# Altium PCB Audio-Switcher-v1.1.PcbDoc (part 1 of 2)
Units mil, origin at the board's own origin, x right, y up, seen from the top; angles counter-clockwise.
Board outline 6000 x 4000 mil, 2 copper layers (Top Layer, Bottom Layer); 150 components, 118 nets, 462 pads, 0 vias.
Unrouted connection lines stored in the file: 298.
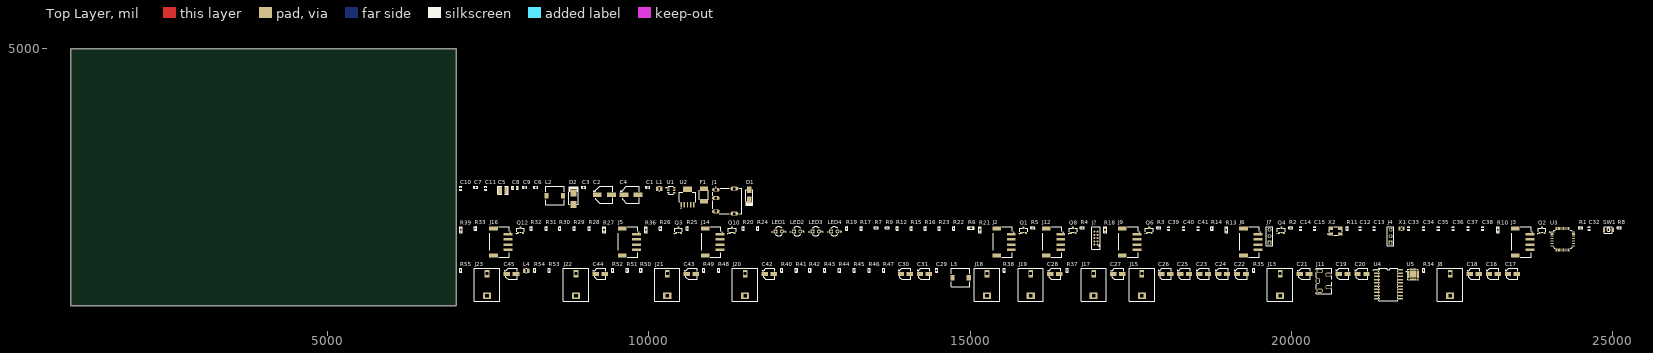
[diagram p0: Top Layer view]
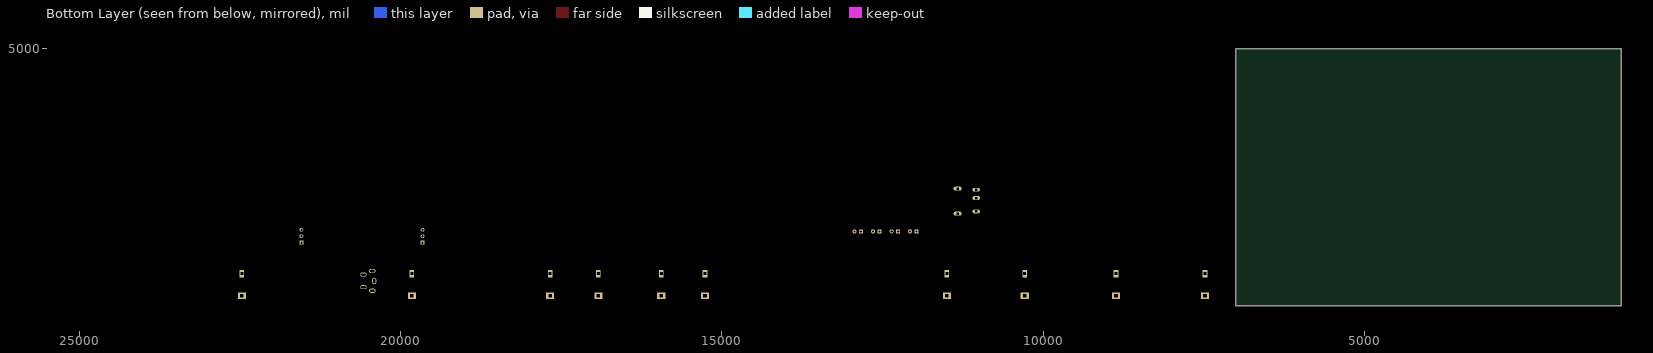
[diagram p1: Bottom Layer view, seen from below]

## Layer stack, top to bottom
Top Solder: solder mask 0.4, Solder Resist, Dk 3.5
Top Layer: signal copper 1.4
Dielectric 1: dielectric 12.6, FR-4, Dk 4.8
Bottom Layer: signal copper 1.4
Bottom Solder: solder mask 0.4, Solder Resist, Dk 3.5

## Board outline
1000,1000 7000,1000 7000,5000 1000,5000

## Design rules (kind name [scope] priority, off if disabled: settings)
Clearance [All] p1: gap=10 ignorepadtopadclearanceinfootprint=FALSE except(0: Arc-Hole Track-Hole SMDPad-Hole THPad-Hole Via-Hole Fill-Hole Poly-Hole Region-Hole Text-Hole)
PolygonConnect [All] p1: connectstyle=Relief reliefconductorwidth=10 reliefentries=4 polygonreliefangle="90 Angle" airgapwidth=10
RoutingVias [All] p1: holewidth=28 width=50 viastyle="Through Hole" minholewidth=28 minwidth=50 maxholewidth=28 maxwidth=50
SolderMaskExpansion [All] p1: expansion=4 istentingtop=FALSE
Width [All] p1: maxlimit=10 minlimit=10 preferedwidth=10
30 further rules are at their usual default settings.

## Classes and differential pairs
component class U_Power-Sheet: C1 C2 C3 C4 C5 C6 C7 C8 C9 C10 C11 D1 D2 F1 J1 L1 L2 U1 U2
component class U_Controller-Sheet: C12 C13 C14 C15 C32 C33 C34 C35 C36 C37 C38 C39 C40 C41 J2 J3 J4 J5 J6 J7 J9 J12 J14 J16 J? LED1 LED2 LED3 LED4 Q1 Q2 Q3 Q4 Q6 Q8 Q10 Q12 R1 R2 R3 R4 R5 R6 R7 R8 R9 R10 R11 R12 R13 R14 R15 R16 R17 R18 R19 R20 R21 R22 R23 R24 R25 R26 R27 R28 R29 R30 R31 R32 R33 R36 R39 SW1 U3 X1 X2
component class U_Audio-Interface-Sheet: C16 C17 C18 C19 C20 C21 C22 C23 C24 C25 C26 C27 C28 C29 C30 C31 C42 C43 C44 C45 J8 J11 J13 J15 J17 J18 J19 J20 J21 J22 J23 L3 L4 R34 R35 R37 R38 R40 R41 R42 R43 R44 R45 R46 R47 R48 R49 R50 R51 R52 R53 R54 R55 U4 U5

## Components (designator, comment, footprint, x,y, rotation, side; value= is the part's Value field where it differs from the comment)
C1 "0.1uF" Cap-0402 9985,2840 r0 top
C2 "47uF" RVT1H470M0607 9305,2725 r0 top
C3 "0.1uF" Cap-0402 8985,2840 r0 top
C4 "47uF" RVT1H470M0607 9720,2725 r0 top
C5 "10uF" Cap-1210 7730,2795 r0 top
C6 "1uF" Cap-0402 8240,2840 r0 top
C7 "22uF" Cap-0402 7305,2840 r0 top
C8 "2.2uF" CAP-0603 7915,2835 r0 top
C9 "1uF" Cap-0402 8070,2840 r0 top
C10 "10nF" Cap-0402 7070,2825 r90 top
C11 "22uF" Cap-0402 7460,2825 r90 top
C12 "20pF" Cap-0402 21065,2200 r90 top
C13 "20pF" Cap-0402 21285,2200 r90 top
C14 "20pF" Cap-0402 20140,2200 r90 top
C15 "20pF" Cap-0402 20360,2200 r90 top
C16 "10uF" EEEFK1E100R_ 23140,1495 r0 top
C17 "10uF" EEEFK1E100R_ 23435,1495 r0 top
C18 "1uF" 865060640001 22840,1495 r0 top
C19 "10uF" EEEFK1E100R_ 20800,1495 r0 top
C20 "10uF" EEEFK1E100R_ 21095,1495 r0 top
C21 "1uF" 865060640001 20200,1495 r0 top
C22 "10uF" EEEFK1E100R_ 19220,1495 r0 top
C23 "10uF" EEEFK1E100R_ 18630,1495 r0 top
C24 "10uF" EEEFK1E100R_ 18925,1495 r0 top
C25 "10uF" EEEFK1E100R_ 18335,1495 r0 top
C26 "10uF" EEEFK1E100R_ 18040,1495 r0 top
C27 "1uF" 865060640001 17295,1495 r0 top
C28 "1uF" 865060640001 16315,1495 r0 top
C29 "0.1uF" Cap-0402 14475,1550 r90 top
C30 "10uF" EEEFK1E100R_ 13990,1495 r0 top
C31 "10uF" EEEFK1E100R_ 14285,1495 r0 top
C32 "0.1uF" Cap-0402 24630,2200 r90 top
C33 "1uF" Cap-0402 21825,2200 r90 top
C34 "0.1uF" Cap-0402 22055,2200 r90 top
C35 "0.1uF" Cap-0402 22285,2200 r90 top
C36 "0.1uF" Cap-0402 22515,2200 r90 top
C37 "0.1uF" Cap-0402 22745,2200 r90 top
C38 "0.1uF" Cap-0402 22975,2200 r90 top
C39 "1uF" Cap-0402 18090,2200 r90 top
C40 "0.1uF" Cap-0402 18320,2200 r90 top
C41 "4.7uF" Cap-0402 18550,2200 r90 top
C42 "1uF" 865060640001 11870,1495 r0 top
C43 "1uF" 865060640001 10660,1495 r0 top
C44 "1uF" 865060640001 9240,1495 r0 top
C45 "1uF" 865060640001 7860,1495 r0 top
D1 "SS16" SMA 11560,2725 r90 top
D2 "SMBJ26A-13-F" SMB_ 8825,2665 r90 top
F1 "33V 1.5A" Fuse-1812_ 10855,2720 r90 top
J1 "PJ-051AH" PJ-051AH 11185,2625 r0 top
J2 "S4B-PH-SM4-TB(LF)(SN)" S4B-PH-SM4-TB(LF)(SN) 15525,1990 r90 top
J3 "S4B-PH-SM4-TB(LF)(SN)" S4B-PH-SM4-TB(LF)(SN) 23595,1990 r90 top
J4 "X6511WV-03H-C60D30" HDR1X3_ 21540,1980 r90 top
J5 "S4B-PH-SM4-TB(LF)(SN)" S4B-PH-SM4-TB(LF)(SN) 9695,1990 r90 top
J6 "S4B-PH-SM4-TB(LF)(SN)" S4B-PH-SM4-TB(LF)(SN) 19365,1990 r90 top
J7 "X6511WV-03H-C60D30" HDR1X3_ 19655,1980 r90 top
J8 "KLPX-0848-2-B" KLPX-0848-2-B 22465,1325 r90 top
J9 "S4B-PH-SM4-TB(LF)(SN)" S4B-PH-SM4-TB(LF)(SN) 17480,1990 r90 top
J11 "PJ-3582-B" PJ-3582-B 20505,1385 r90 top
J12 "S4B-PH-SM4-TB(LF)(SN)" S4B-PH-SM4-TB(LF)(SN) 16295,1990 r90 top
J13 "KLPX-0848-2-R" KLPX-0848-2-R 19820,1325 r90 top
J14 "S4B-PH-SM4-TB(LF)(SN)" S4B-PH-SM4-TB(LF)(SN) 10990,1990 r90 top
J15 "KLPX-0848-2-R" KLPX-0848-2-R 17670,1325 r90 top
J16 "S4B-PH-SM4-TB(LF)(SN)" S4B-PH-SM4-TB(LF)(SN) 7695,1990 r90 top
J17 "KLPX-0848-2-B" KLPX-0848-2-B 16920,1325 r90 top
J18 "KLPX-0848-2-R" KLPX-0848-2-R 15260,1325 r90 top
J19 "KLPX-0848-2-R" KLPX-0848-2-R 15940,1325 r90 top
J20 "KLPX-0848-2-B" KLPX-0848-2-B 11495,1325 r90 top
J21 "KLPX-0848-2-R" KLPX-0848-2-R 10285,1325 r90 top
J22 "KLPX-0848-2-B" KLPX-0848-2-B 8865,1325 r90 top
J23 "KLPX-0848-2-R" KLPX-0848-2-R 7480,1325 r90 top
J? "TC2050-IDC-NL" TC2050-IDC-NL_ 16955,2050 r90 top
L1 "470nH" IND-0806 10160,2820 r0 top
L2 "4.7uH" YPRH0703-4R7M 8535,2710 r0 top
L3 "4.7uH" YPRH0703-4R7M 14850,1435 r0 top
L4 "470nH" IND-0806 8090,1545 r0 top
LED1 "IR LED 3mm" "TH LED 3mm_" 12020,2155 r0 top
LED2 "IR LED 3mm" "TH LED 3mm_" 12305,2155 r0 top
LED3 "IR LED 3mm" "TH LED 3mm_" 12595,2155 r0 top
LED4 "IR LED 3mm" "TH LED 3mm_" 12885,2155 r0 top
Q1 "DDTD113ZC-7-F" SOT-23 15830,2170 r0 top
Q2 "DDTD113ZC-7-F" SOT-23 23895,2170 r0 top
Q3 "DDTD113ZC-7-F" SOT-23 10460,2170 r0 top
Q4 "DDTD113ZC-7-F" SOT-23 19840,2170 r0 top
Q6 "DDTD113ZC-7-F" SOT-23 17785,2170 r0 top
Q8 "DDTD113ZC-7-F" SOT-23 16600,2170 r0 top
Q10 "DDTD113ZC-7-F" SOT-23 11295,2170 r0 top
Q12 "DDTD113ZC-7-F" SOT-23 8000,2170 r0 top
R1 "4.7K" Res-0402 24495,2215 r0 top
R2 "4.7K" Res-0402 19985,2215 r0 top
R3 "4.7K" Res-0402 17935,2215 r0 top
R4 "4.7K" Res-0402 16745,2215 r0 top
R5 "4.7K" Res-0402 15975,2215 r0 top
R6 "100R" Res-0603 15010,2210 r0 top
R7 "330K" Res-0402 13535,2215 r0 top value=330kR
R8 "10K" Res-0402 25100,2215 r0 top
R9 "330K" Res-0402 13705,2215 r0 top value=330kR
R10 "100R" Res-0603 23210,2180 r90 top
R11 "10K" Res-0402 20865,2200 r90 top
R12 "330K" Res-0402 13860,2200 r90 top value=330kR
R13 "100R" Res-0603 18985,2180 r90 top
R14 "10K" Res-0402 18760,2200 r90 top
R15 "330K" Res-0402 14080,2200 r90 top value=330kR
R16 "4.7K" Res-0402 14300,2200 r90 top
R17 "4.7K" Res-0402 13300,2200 r90 top
R18 "100R" Res-0603 17100,2180 r90 top
R19 "10K" Res-0402 13080,2200 r90 top
R20 "4.7K" Res-0402 11465,2200 r90 top
R21 "100R" Res-0603 15150,2180 r90 top
R22 "4.7K" Res-0402 14745,2200 r90 top
R23 "4.7K" Res-0402 14515,2200 r90 top
R24 "10K" Res-0402 11695,2200 r90 top
R25 "4.7K" Res-0402 10595,2200 r90 top
R26 "10K" Res-0402 10180,2200 r90 top
R27 "100R" Res-0603 9305,2180 r90 top
R28 "10K" Res-0402 9070,2200 r90 top
R29 "10K" Res-0402 8840,2200 r90 top
R30 "10K" Res-0402 8610,2200 r90 top
R31 "10K" Res-0402 8400,2200 r90 top
R32 "4.7K" Res-0402 8170,2200 r90 top
R33 "10K" Res-0402 7300,2200 r90 top
R34 "1K" Res-0402 22055,1550 r90 top
R35 "1K" Res-0402 19410,1550 r90 top
R36 "100R" Res-0603 9955,2180 r90 top
R37 "1K" Res-0402 16510,1550 r90 top
R38 "1K" Res-0402 15525,1550 r90 top
R39 "100R" Res-0603 7075,2180 r90 top
R40 "100K" Res-0402 12065,1550 r90 top
R41 "100K" Res-0402 12295,1550 r90 top
R42 "100K" Res-0402 12505,1550 r90 top
R43 "100K" Res-0402 12735,1550 r90 top
R44 "100K" Res-0402 12965,1550 r90 top
R45 "100K" Res-0402 13195,1550 r90 top
R46 "100K" Res-0402 13425,1550 r90 top
R47 "100K" Res-0402 13655,1550 r90 top
R48 "1K" Res-0402 11085,1550 r90 top
R49 "1K" Res-0402 10855,1550 r90 top
R50 "1K" Res-0402 9875,1550 r90 top
R51 "1K" Res-0402 9665,1550 r90 top
R52 "1K" Res-0402 9435,1550 r90 top
R53 "1K" Res-0402 8450,1550 r90 top
R54 "1K" Res-0402 8220,1550 r90 top
R55 "1K" Res-0402 7070,1550 r90 top
SW1 "B3U-1000P" B3U-1000P 24930,2180 r0 top
U1 "AP63205WU-7" TSOT-23-6 10345,2795 r0 top
U2 "TPS79633DCQR" SOT-223-6_ 10600,2690 r0 top
U3 "STM32F103C8T6" "48-LQFP (7x7)_" 24220,2035 r0 top
U4 "PT2258-S" SOP-20-300mil 21505,1330 r0 top
U5 "MAX14661ETI+T" "28-TQFN (4x4)" 21890,1485 r0 top
X1 "32.768KHZ" "2-SMD, (2.00mm x 1.20mm)" 21710,2200 r0 top
X2 "8MHz" 5TJ480000XYLBC_ 20685,2160 r0 top

## Footprints (in the part's own frame and the unit in brackets; to place one, negate y for a bottom-side part, rotate by r counter-clockwise, add the part's x,y. Pads: shape width x height; smd on the part's side, far side on the other; paste and mask are expansions set on the pad)
"2-SMD, (2.00mm x 1.20mm)" [mm]
  rect 0.8x1.5 smd: 1(-0.75,0) 2(0.75,0)
  silkscreen extent -0.15,-0.66 0.18,0.66, body extent -1,-0.6 1,0.6, height 0.35
5TJ480000XYLBC_ [mm]
  rect 1.8x1.3 smd mask+0.07: 1(-1.9,-1.15) 2(1.9,-1.15) 3(1.9,1.15) 4(-1.9,1.15)
  silkscreen extent -3.05,-1.65 2.54,1.65, body extent -2.5,-1.6 2.5,1.6, height 1
"28-TQFN (4x4)" [mm]
  rect 0.86x0.22 smd: 1(-1.935,1.2) 2(-1.935,0.8) 3(-1.935,0.4) 4(-1.935,0) 5(-1.935,-0.4) 6(-1.935,-0.8) 7(-1.935,-1.2) 15(1.935,-1.2) 16(1.935,-0.8) 17(1.935,-0.4) 18(1.935,0) 19(1.935,0.4) 20(1.935,0.8) 21(1.935,1.2)
  rect 0.22x0.86 smd: 8(-1.2,-1.935) 9(-0.8,-1.935) 10(-0.4,-1.935) 11(0,-1.935) 12(0.4,-1.935) 13(0.8,-1.935) 14(1.2,-1.935) 22(1.2,1.935) 23(0.8,1.935) 24(0.4,1.935) 25(0,1.935) 26(-0.4,1.935) 27(-0.8,1.935) 28(-1.2,1.935)
  rect 2.6x2.6 smd paste-0.48: 29(0,0)
  silkscreen extent -2.66,-2.05 2.05,2.05, body extent -2,-2 2,2, height 0.5
"48-LQFP (7x7)_" [mm]
  rect 1.22x0.32 smd: 1(-4.25,2.75) 2(-4.25,2.25) 3(-4.25,1.75) 4(-4.25,1.25) 5(-4.25,0.75) 6(-4.25,0.25) 7(-4.25,-0.25) 8(-4.25,-0.75) 9(-4.25,-1.25) 10(-4.25,-1.75) 11(-4.25,-2.25) 12(-4.25,-2.75) 25(4.25,-2.75) 26(4.25,-2.25) 27(4.25,-1.75) 28(4.25,-1.25) 29(4.25,-0.75) 30(4.25,-0.25) 31(4.25,0.25) 32(4.25,0.75) 33(4.25,1.25) 34(4.25,1.75) 35(4.25,2.25) 36(4.25,2.75)
  rect 0.32x1.22 smd: 13(-2.75,-4.25) 14(-2.25,-4.25) 15(-1.75,-4.25) 16(-1.25,-4.25) 17(-0.75,-4.25) 18(-0.25,-4.25) 19(0.25,-4.25) 20(0.75,-4.25) 21(1.25,-4.25) 22(1.75,-4.25) 23(2.25,-4.25) 24(2.75,-4.25) 37(2.75,4.25) 38(2.25,4.25) 39(1.75,4.25) 40(1.25,4.25) 41(0.75,4.25) 42(0.25,4.25) 43(-0.25,4.25) 44(-0.75,4.25) 45(-1.25,4.25) 46(-1.75,4.25) 47(-2.25,4.25) 48(-2.75,4.25)
  silkscreen extent -5.16,-3.58 3.66,3.58, body extent -4.51,-4.51 4.49,4.49, height 1.43
865060640001 [mm]
  rect 2.6x1.6 smd: 1(-1.8,0) 2(1.8,0)
  silkscreen extent -2.81,-2.18 2.29,2.18, body extent -2.5,-2.15 2.5,2.15, height 5.35
B3U-1000P [mm] "SWITCH TACTILE SPST-NO 0.05A 12V"
  rect 0.82x1.72 smd: 1(-1.7,0) 2(1.7,0)
  silkscreen extent -1.57,-1.3 1.57,1.3, body extent -2,-1.26 2,1.24, height 1.6
Cap-0402 [mil]
  rect 18x25 smd mask+2.36: 1(-18.5,0) 2(18.5,0)
  silkscreen extent -31,-16 31,16, body extent -20,-10 20,10, height 19
CAP-0603 [mil]
  rect 30x35 smd mask+2.36: 1(-30,0) 2(30,0)
  silkscreen extent -49,-21 49,21, body extent -32,-16 31,16, height 34
Cap-1210 [mil] "SMD 1210"
  rect 60x110 smd: 1(-50,0) 2(50,0)
  silkscreen extent -84,-59 84,59, body extent -63,-49 63,49, height 39
EEEFK1E100R_ [mm]
  rect 2.5x1.6 smd: 1(-1.75,0) 2(1.75,0)
  silkscreen extent -2.9,-2.21 2.2,2.21, body extent -2.5,-2.15 2.5,2.15, height 5.8
Fuse-1812_ [mm]
  rect 1.78x3.2 smd: 1(-2.49,0) 2(2.49,0)
  silkscreen extent -1.75,-1.8 1.85,1.8, body extent -2.36,-1.74 2.37,1.74, height 1.03
HDR1X3_ [mm] "Connector; Header; 3 Position"
  rect 1.5x1.5 hole 0.9: 1(0,0)
  round 1.5 hole 0.9: 2(2.54,0) 3(5.08,0)
  silkscreen extent -1.27,-1.27 6.35,1.27, body extent -1.27,-1.24 6.35,1.25, height 8.54
IND-0806 [mm]
  rect 1x1.72 smd: 1(-0.825,0) 2(0.825,0)
  silkscreen extent -0.13,-0.86 0.15,0.86, body extent -1,-0.8 1,0.8, height 1.2
KLPX-0848-2-B [mm]
  rect 2.5x3.2 hole 1.2 square: 1(-4.35,0)
  rect 3x1.8 hole 1 square: 2(4.35,0)
  silkscreen extent -6.5,-5 6.5,5, body extent -6.5,-5 6.5,5, height 19.5
KLPX-0848-2-R [mm]
  rect 2.5x3.2 hole 1.2 square: 1(-4.35,0)
  rect 3x1.8 hole 1 square: 2(4.35,0)
  silkscreen extent -6.5,-5 6.5,5, body extent -6.5,-5 6.5,5, height 19.5
PJ-051AH [mm]
  oval 3x1.5 hole 0.8 square: 1(-3.65,4.55) 2(-3.65,-4.05) 3(-3.65,1.25)
  oval 3.2x1.6 hole 0.8 square: S1(3.65,4.95) S2(3.65,-4.95)
  round 0 hole 2.5 unplated: ""(2.65,1.25)
  silkscreen extent -4.85,-5.05 6.65,5.71, body extent -5.15,-5.08 6.6,5.02, height 7.3
PJ-3582-B [mm]
  oval 2.5x1.6 hole 0.8 slot 1.7 at 0 deg paste+0 mask+0.051: 2(0,2.5)
  oval 1.6x2.5 hole 0.8 slot 1.7 at 90 deg paste+0 mask+0.051: 3(-3.9,1.75) 4(-2.5,-1.75) 5(2.5,-1.75) 6(3.9,1.75)
  round 0 hole 1.2 unplated: S7(0,-2.5)
  silkscreen extent -5,-3.05 5,3.05, body extent -5,-3.06 5.01,3.04, height 15.1
Res-0402 [mil]
  rect 18x25 smd mask+2.17: 1(-18.5,0) 2(18.5,0)
  silkscreen extent -32,-17 32,16, body extent -23,-11 23,11, height 16
Res-0603 [mil]
  rect 30x35 smd: 1(-30,0) 2(30,0)
  silkscreen extent -48,-21 48,21, body extent -31,-17 31,17, height 18
RVT1H470M0607 [mm]
  rect 3.5x1.6 smd: 1(-2.8,0) 2(2.8,0)
  silkscreen extent -4.27,-3.33 3.32,3.33, body extent -3.31,-3.33 3.29,3.27, height 7.94
S4B-PH-SM4-TB(LF)(SN) [mm]
  rect 1x3.5 smd: 1(3,-2.875) 2(1,-2.875) 3(-1,-2.875) 4(-3,-2.875)
  rect 1.5x3.4 smd: P1(5.35,2.875) P2(-5.35,2.875)
  silkscreen extent -5.99,-3.89 5.99,4.34, body extent -5.95,-4.3 5.95,4.3, height 5.6
SMA [mm]
  rect 2.5x1.7 smd: 1(-2,0) 2(2,0)
  silkscreen extent -4.45,-1.42 2.06,1.42, body extent -2.6,-1.3 2.6,1.3, height 2.4
SMB_ [mm]
  rect 2.8x2.4 smd: 1(-2.3,0) 2(2.3,0)
  silkscreen extent -2.21,-1.91 4.83,1.91, body extent -2.7,-1.8 2.7,1.8, height 2.3
SOP-20-300mil [mm]
  rect 2.3x0.6 smd paste+0 mask+0.051: 1(-4.55,5.715) 2(-4.55,4.445) 3(-4.55,3.175) 4(-4.55,1.905) 5(-4.55,0.635) 6(-4.55,-0.635) 7(-4.55,-1.905) 8(-4.55,-3.175) 9(-4.55,-4.445) 10(-4.55,-5.715) 11(4.55,-5.715) 12(4.55,-4.445) 13(4.55,-3.175) 14(4.55,-1.905) 15(4.55,-0.635) 16(4.55,0.635) 17(4.55,1.905) 18(4.55,3.175) 19(4.55,4.445) 20(4.55,5.715)
  silkscreen extent -5.94,-6.4 3.75,6.4
SOT-23 [mm] "TRANS NPN 40V 0.6A SOT23"
  rect 0.82x0.92 smd: 1(-0.95,-1) 2(0.95,-1) 3(0,1)
  silkscreen extent -1.68,-1.3 1.55,0.81, body extent -1.5,-1.25 1.5,1.25, height 1.05
SOT-223-6_ [mm]
  rect 0.55x2.15 smd: 1(-2.54,-3.1) 2(-1.27,-3.1) 3(0,-3.1) 4(1.27,-3.1) 5(2.54,-3.1)
  rect 3.5x2.2 smd: 6(0,3.1)
  silkscreen extent -3.33,-4.51 3.33,1.84, body extent -3.27,-3.63 3.27,3.63, height 1.8
TC2050-IDC-NL_ [mm] "CBL PLUG-OF-NAILS 10-PIN"
  round 0.787 smd: 1(-2.54,-0.635) 2(-1.27,-0.635) 3(0,-0.635) 4(1.27,-0.635) 5(2.54,-0.635) 6(2.54,0.635) 7(1.27,0.635) 8(0,0.635) 9(-1.27,0.635) 10(-2.54,0.635)
  round 0 hole 0.991: MP1(-3.81,0) MP2(3.81,1.015) MP3(3.81,-1.015)
  silkscreen extent -4.47,-1.75 4.52,1.7
"TH LED 3mm_" [mm]
  rect 1.6x1.6 hole 0.9: 1(-1.27,0)
  round 1.6 hole 0.9: 2(1.27,0)
  silkscreen extent -2.9,-1.8 2.92,1.8, body extent -1.5,-2 2,2, height 6.25
TSOT-23-6 [mm]
  rect 1x0.6 smd: 1(-1.2,0.95) 2(-1.2,0) 3(-1.2,-0.95) 4(1.2,-0.95) 5(1.2,0) 6(1.2,0.95)
  silkscreen extent -1.98,-1.5 0.86,1.5, body extent -1.41,-1.45 1.41,1.45, height 1
YPRH0703-4R7M [mm]
  rect 1.6x2.2 smd: 1(-3.2,0) 2(3.2,0)
  silkscreen extent -3.65,-3.65 3.65,3.65, body extent -3.66,-3.66 3.66,3.66, height 4.2

## Part data
C1: library part CL05B104KB54PNC, "CAP CER 0.1UF 50V X7R 0402", LCSC Part Number=C307331, Manufacturer=Samsung, Supplier Part Number 1=1276-CL05B104KB54PNCDKR-ND, Manufacturer Part Number=CL05B104KB54PNC, Pricing 1="1=0.1, 10=0.067, 50=0.0366, 100=0.0299, 500=0.02138, 1000=0.01681, 2500=0.01528, 5000=0.01406 (USD)", Stock 1=8594, Supplier 1=Digi-Key
C2 C4: library part RVT1H470M0607, "47uF 50V 66mA@120Hz ±20% SMD,D6.3xL7.7mm Aluminum Electrolytic Capacitors - SMD ROHS", LCSC Part Number=C72523, Manufacturer=ROQANG, Package=SMD,D6.3xL7.7mm, ComponentLink1Description=LCSC, ComponentLink1URL=https://www.lcsc.com/product-detail/Aluminum-Electrolytic-Capacitors-SMD_ROQANG-RVT1H470M0607_C72523.html, Item Type=Capacitor, Manufacturer Part Number=RVT1H470M0607
C3 C29 C32 C34 C35 C36 C37 C38 C40: library part CC0402KRX7R8BB104, "CAP CER 0.1UF 25V X7R 0402", Capacitance=100nF, Case Code (Imperial)=0402, Case Code (Metric)=1005, Dielectric=X7R, LCSC Part Number=C105883, Manufacturer=Yageo, Max Operating Temperature=125°C, Min Operating Temperature=-55°C, Resistor Type=Ceramic, Supplier Part Number 1=311-2077-1-ND, Tolerance=10%, Voltage Rating=25V, Case/Package=0402, Category="Ceramic Capacitors", ComponentLink1Description=https://datasheet.ciiva.com/11464/upy-gphc-x7r-6-3v-to-50v-8-11464889.pdf?src-supplier=Avnet, ComponentLink1URL=https://datasheet.ciiva.com/11464/upy-gphc-x7r-6-3v-to-50v-8-11464889.pdf?src-supplier=Avnet, ComponentLink2Description=https://datasheet.ciiva.com/13210/upy-gphc-x7r-6-3v-to-50v-8-12304-13210908.pdf?src-supplier=Mouser, ComponentLink2URL=https://datasheet.ciiva.com/13210/upy-gphc-x7r-6-3v-to-50v-8-12304-13210908.pdf?src-supplier=Mouser, ComponentLink3Description=https://datasheet.ciiva.com/17437/upy-gphc-x7r-6-3v-to-50v-8-17437357.pdf?src-supplier=Avnet+Europe, ComponentLink3URL=https://datasheet.ciiva.com/17437/upy-gphc-x7r-6-3v-to-50v-8-17437357.pdf?src-supplier=Avnet+Europe, Depth=0.5mm, Dissipation Factor=3.5%, Halogen Free="Halogen Free", Height=0.5mm, Lead Free="Lead Free", Length=1mm, Manufacturer Part Number=CC0402KRX7R8BB104, Mount="Surface Mount", Packaging="Tape and Reel", Pricing 1="1=0.10000, 10=0.03100, 50=0.01700, 100=0.01390, 500=0.00990, 1000=0.00777, 2500=0.00707, 5000=0.00650 (USD)", Radiation Hardening=No, RoHS=Yes, Stock 1=1841009, Supplier 1=Digi-Key, Termination=SMD/SMT, Thickness=0.022inch, Voltage Rating (DC)=25V, Width=0.02inch
C5: library part GRM32ER71J106KA12L, "Multilayer Ceramic Capacitors MLCC - SMD/SMT 1210 10uF 63volts *Derate Voltage/Temp", LCSC Part Number=C437568, Manufacturer=Murata, Package=1210, Category="Ceramic Capacitors", ComponentLink1Description=http://www.mouser.com/ds/2/281/c02e-2905.pdf?src-supplier=Mouser, ComponentLink1URL=http://www.mouser.com/ds/2/281/c02e-2905.pdf?src-supplier=Mouser, ComponentLink2Description=http://www.farnell.com/datasheets/2079202.pdf?src-supplier=Farnell, ComponentLink2URL=http://www.farnell.com/datasheets/2079202.pdf?src-supplier=Farnell, ComponentLink3Description=http://search.murata.co.jp/Ceramy/image/img/A01X/G101/ENG/GRM32ER71J106KA12-01.pdf?src-supplier=Digi-Key, ComponentLink3URL=http://search.murata.co.jp/Ceramy/image/img/A01X/G101/ENG/GRM32ER71J106KA12-01.pdf?src-supplier=Digi-Key, ComponentLink4Description=https://datasheet.octopart.com/GRM32ER71J106KA12L-Murata-datasheet-22122223.pdf?src-supplier=Future+Electronics, ComponentLink4URL=https://datasheet.octopart.com/GRM32ER71J106KA12L-Murata-datasheet-22122223.pdf?src-supplier=Future+Electronics, ComponentLink5Description=http://psearch.en.murata.com/capacitor/product/GRM32ER71J106KA12%23.pdf?src-supplier=Avnet, ComponentLink5URL=http://psearch.en.murata.com/capacitor/product/GRM32ER71J106KA12%23.pdf?src-supplier=Avnet, ComponentLink6Description=http://www.farnell.com/datasheets/2079202.pdf?src-supplier=Newark, ComponentLink6URL=http://www.farnell.com/datasheets/2079202.pdf?src-supplier=Newark, ComponentLink7Description=http://www.farnell.com/datasheets/2079202.pdf?src-supplier=Element14, ComponentLink7URL=http://www.farnell.com/datasheets/2079202.pdf?src-supplier=Element14, ComponentLink8Description=LCSC, ComponentLink8URL=https://www.lcsc.com/product-detail/Multilayer-Ceramic-Capacitors-MLCC-SMD-SMT_Murata-Electronics-GRM32ER71J106KA12L_C437568.html, Item Type=Capacitor, Manufacturer Part Number=GRM32ER71J106KA12L, Pricing="1000=0.3451, 2000=0.33698, 4000=0.32886, 6000=0.32074, 8000=0.31262 (USD)", RoHS=Yes, Stock=55000, Supplier=Avnet, Supplier Part Number=GRM32ER71J106KA12L
C6 C9 C33 C39: library part CC0402KRX5R7BB105, "CAP CER 1UF 16V X5R 0402", Case Code (Imperial)=0402, Case Code (Metric)=1005, Dielectric=X5R, LCSC Part Number=C325464, Manufacturer=Yageo, Max Operating Temperature=85°C, Min Operating Temperature=-55°C, Supplier Part Number 1=311-1691-6-ND, Tolerance=10%, Voltage Rating=16V, Capacitance=1uF, Case/Package=0402, ComponentLink1Description=http://www.yageo.com/documents/recent/UPY-GPHC_X5R_4V-to-50V_12.pdf?src-supplier=Avnet+Europe, ComponentLink1URL=http://www.yageo.com/documents/recent/UPY-GPHC_X5R_4V-to-50V_12.pdf?src-supplier=Avnet+Europe, Composition=Ceramic, Depth=0.5mm, Halogen Free="Halogen Free", Height=0.5mm, Item Type=Capacitor, Lead Free="Lead Free", Length=1mm, Manufacturer Part Number=CC0402KRX5R7BB105, Mount="Surface Mount", Packaging="Tape and Reel", Pricing 1="1=0.36, 10=0.252, 100=0.1512, 500=0.1134, 1000=0.09576, 2500=0.09072, 5000=0.08568 (USD)", Radiation Hardening=No, Stock 1=1405667, Supplier 1=Digi-Key, Termination=SMD/SMT, Thickness=0.022inch, Voltage Rating (DC)=16V, Weight=2.3E-05oz, Width=0.02inch
C7 C11: library part GRM158R61A226ME15D, "CAP CER 22UF 10V X5R 0402", Case/Package=343Case, Dielectric=1537DielectricType, Max Operating Temperature=85°C, Min Operating Temperature=-55°C, Supplier Part Number=490-GRM158R61A226ME15DCT-ND, Tolerance=20%, Voltage Rating=10V, Category="Ceramic Capacitors", Height=800um, Item Type=Capacitor, Length=1mm, Material=4241ConductorMaterial, Pricing="1=0.45, 10=0.299, 50=0.2202, 100=0.1794, 500=0.1416, 1000=0.11957, 2500=0.11328 (USD)", RoHS=Yes, Stock=26634, Supplier=Digi-Key, Thickness=800um, Voltage Rating (DC)=10V, Width=500um
C8: library part CC0603KRX5R8BB225, "CAP CER 2.2UF 25V X5R 0603", Case Code (Imperial)=0603, Case Code (Metric)=1608, Dielectric=X5R, LCSC Part Number=C309478, Manufacturer=Yageo, Max Operating Temperature=85°C, Min Operating Temperature=-55°C, Package Quantity=4000, Resistor Type=Ceramic, Supplier Part Number 1=311-1786-1-ND, Tolerance=10%, Voltage Rating=25V, Capacitance=2.2uF, Case/Package=0603, ComponentLink1Description=https://www.verical.com/server-webapp/html/getDatasheet?partID=782757&src-supplier=Verical, ComponentLink1URL=https://www.verical.com/server-webapp/html/getDatasheet?partID=782757&src-supplier=Verical, Depth=0.8mm, Halogen Free="Halogen Free", Item Type=Capacitor, Lead Free="Lead Free", Length=1.6mm, Manufacturer Part Number=CC0603KRX5R8BB225, Mount="Surface Mount", Packaging="Tape and Reel", Pricing 1="1=0.4, 10=0.276, 50=0.1932, 100=0.1656, 500=0.1242, 1000=0.10488 (USD)", Radiation Hardening=No, RoHS Compliant=Yes, Stock 1=687936, Supplier 1=Digi-Key, Termination=SMD/SMT, Thickness=0.037inch, Voltage Rating (DC)=25V, Weight=7.1E-05oz, Width=0.031inch
C10: library part CC0402KRX7R8BB103, "CAP CER 10000PF 25V X7R 0402", Case Code (Imperial)=0402, Case Code (Metric)=1005, Dielectric=X7R, LCSC Part Number=C327025, Manufacturer=Yageo, Max Operating Temperature=125°C, Min Operating Temperature=-55°C, Package Quantity=1, Supplier Part Number 1=311-1337-1-ND, Tolerance=10%, Voltage Rating=25V, Capacitance=10nF, Case/Package=0402, ComponentLink1Description=http://www.yageo.com/documents/recent/UPY-GPHC_X7R_6.3V-to-50V_18.pdf?src-supplier=Digi-Key, ComponentLink1URL=http://www.yageo.com/documents/recent/UPY-GPHC_X7R_6.3V-to-50V_18.pdf?src-supplier=Digi-Key, ComponentLink2Description=https://www.verical.com/server-webapp/html/getDatasheet?partID=375418&src-supplier=Verical, ComponentLink2URL=https://www.verical.com/server-webapp/html/getDatasheet?partID=375418&src-supplier=Verical, ComponentLink3Description=http://www.yageo.com/documents/recent/UPY-GPHC_X7R_6.3V-to-50V_8.pdf?src-supplier=Avnet, ComponentLink3URL=http://www.yageo.com/documents/recent/UPY-GPHC_X7R_6.3V-to-50V_8.pdf?src-supplier=Avnet, ComponentLink4Description=https://4donline.ihs.com/images/VipMasterIC/IC/YAGO/YAGO-S-A0003557223/YAGO-S-A0003557223-1.pdf?hkey=52A5661711E402568146F3353EA87419&src-supplier=Element14, ComponentLink4URL=https://4donline.ihs.com/images/VipMasterIC/IC/YAGO/YAGO-S-A0003557223/YAGO-S-A0003557223-1.pdf?hkey=52A5661711E402568146F3353EA87419&src-supplier=Element14, ComponentLink5Description=http://www.farnell.com/datasheets/2167236.pdf?src-supplier=Element14, ComponentLink5URL=http://www.farnell.com/datasheets/2167236.pdf?src-supplier=Element14, ComponentLink6Description=http://www.mouser.com/ds/2/447/Yageo_UPY-GP_NP0_16V-to-50V_9-358835.pdf?src-supplier=Mouser, ComponentLink6URL=http://www.mouser.com/ds/2/447/Yageo_UPY-GP_NP0_16V-to-50V_9-358835.pdf?src-supplier=Mouser, Composition=Ceramic, Depth=0.5mm, Halogen Free="Halogen Free", Height=0.5mm, Item Type=Capacitor, Lead Free="Lead Free", Length=1mm, Manufacturer Part Number=CC0402KRX7R8BB103, Mount="Surface Mount", Packaging="Tape and Reel", Pricing 1="1=0.1, 10=0.021, 100=0.0093, 500=0.00666, 1000=0.00523, 2500=0.00476, 5000=0.00438 (USD)", Radiation Hardening=No, REACH SVHC=Unknown, Stock 1=0, Supplier 1=Digi-Key, Termination=SMD/SMT, Thickness=0.022inch, Voltage Rating (DC)=25V, Width=0.02inch
C12 C13 C14 C15: library part CC0402JRNPO9BN200, "CAP CER 20PF 50V C0G/NPO 0402", LCSC Part Number=C107000, Manufacturer=Yageo, Temperature Coefficient=30ppm/°C, ComponentLink1Description=https://datasheet.ciiva.com/176/mlccorderingcode-176360.pdf?src-supplier=Digikey, ComponentLink1URL=https://datasheet.ciiva.com/176/mlccorderingcode-176360.pdf?src-supplier=Digikey, ComponentLink2Description=https://datasheet.ciiva.com/176/mlccorderingcode-176361.pdf?src-supplier=Digikey, ComponentLink2URL=https://datasheet.ciiva.com/176/mlccorderingcode-176361.pdf?src-supplier=Digikey, ComponentLink3Description=https://datasheet.ciiva.com/176/mlccorderingcode-176362.pdf?src-supplier=Digikey, ComponentLink3URL=https://datasheet.ciiva.com/176/mlccorderingcode-176362.pdf?src-supplier=Digikey, ComponentLink4Description=https://datasheet.ciiva.com/7656/1132289-7656614.pdf?src-supplier=Element14, ComponentLink4URL=https://datasheet.ciiva.com/7656/1132289-7656614.pdf?src-supplier=Element14, ComponentLink5Description=https://datasheet.ciiva.com/5427/upy-gp-np0-16v-to-50v-8-3714-5427769.pdf?src-supplier=Mouser, ComponentLink5URL=https://datasheet.ciiva.com/5427/upy-gp-np0-16v-to-50v-8-3714-5427769.pdf?src-supplier=Mouser, Halogen Free=5694HalogenFree, Item Type=Capacitor, Manufacturer Part Number=CC0402JRNPO9BN200, Pricing="10000=0.00221 (USD)", RoHS=Yes, Stock=20000, Supplier=Avnet
C16 C17 C19 C20 C22 C23 C24 C25 C26 C30 C31: library part EEEFK1E100R, "CAP ALUM 10UF 20% 25V SMD", Case/Package=Radial, Dielectric Material=Aluminium, ESR (Equivalent Series Resistance)=1.35R, LCSC Part Number=C178538, Leakage Current=3uA, Manufacturer=Panasonic, Manufacturer Part Number=EEE-FK1E100R, Max Operating Temperature=105°C, Min Operating Temperature=-55°C, Package Quantity=1, Ripple Current=90mA, Supplier Part Number 1=PCE3795CT-ND, Tolerance=20%, Voltage=25V, Capacitance=10uF, ComponentLink1Description=http://www.jameco.com/Jameco/Products/ProdDS/1357642.pdf?src-supplier=Jameco, ComponentLink1URL=http://www.jameco.com/Jameco/Products/ProdDS/1357642.pdf?src-supplier=Jameco, ComponentLink2Description=http://www.farnell.com/datasheets/2002520.pdf?src-supplier=Farnell, ComponentLink2URL=http://www.farnell.com/datasheets/2002520.pdf?src-supplier=Farnell, ComponentLink3Description=http://www.farnell.com/datasheets/58258.pdf?src-supplier=Element14, ComponentLink3URL=http://www.farnell.com/datasheets/58258.pdf?src-supplier=Element14, ComponentLink4Description=http://www.mouser.com/ds/2/315/ABA0000CE120-68386.pdf?src-supplier=Mouser, ComponentLink4URL=http://www.mouser.com/ds/2/315/ABA0000CE120-68386.pdf?src-supplier=Mouser, ComponentLink5Description=http://uk.rs-online.com/webdocs/139e/0900766b8139e400.pdf?src-supplier=RSComponents, ComponentLink5URL=http://uk.rs-online.com/webdocs/139e/0900766b8139e400.pdf?src-supplier=RSComponents, ComponentLink6Description=http://www.farnell.com/datasheets/2813657.pdf?src-supplier=Farnell, ComponentLink6URL=http://www.farnell.com/datasheets/2813657.pdf?src-supplier=Farnell, ComponentLink7Description=http://www.farnell.com/datasheets/2002520.pdf?src-supplier=Element14, ComponentLink7URL=http://www.farnell.com/datasheets/2002520.pdf?src-supplier=Element14, ComponentLink8Description=http://www.farnell.com/datasheets/1676921.pdf?src-supplier=Element14, ComponentLink8URL=http://www.farnell.com/datasheets/1676921.pdf?src-supplier=Element14, ComponentLink9Description=http://industrial.panasonic.com/www-data/pdf/ABA0000/ABA0000CE120.pdf?src-supplier=Avnet, ComponentLink9URL=http://industrial.panasonic.com/www-data/pdf/ABA0000/ABA0000CE120.pdf?src-supplier=Avnet, ComponentLink10Description=http://industrial.panasonic.com/www-data/pdf/ABA0000/ABA0000CE120.pdf?src-supplier=Future+Electronics, ComponentLink10URL=http://industrial.panasonic.com/www-data/pdf/ABA0000/ABA0000CE120.pdf?src-supplier=Future+Electronics, ComponentLink11Description=https://www.verical.com/server-webapp/html/getDatasheet?partID=134702&src-supplier=Verical, ComponentLink11URL=https://www.verical.com/server-webapp/html/getDatasheet?partID=134702&src-supplier=Verical, ComponentLink12Description=http://industrial.panasonic.com/www-data/pdf/ABA0000/ABA0000CE120.pdf?src-supplier=Avnet+Europe, ComponentLink12URL=http://industrial.panasonic.com/www-data/pdf/ABA0000/ABA0000CE120.pdf?src-supplier=Avnet+Europe, Construction=Cylindrical, Contact Plating=Tin, Diameter=4mm, Height=5.8mm, Height - Seated (Max)=0.24inch, Impedance=1.35R, Item Type=Capacitor, Lead Free="Lead Free", Length=5.8mm, Life (Hours)=2000Hour, Mount="Surface Mount,PCB", Number of Pins=2, Packaging="Tape and Reel", Polarity=Polar, Pricing 1="1=0.38, 10=0.264, 50=0.1852, 100=0.1587, 500=0.11902, 1000=0.10051 (USD)", Radiation Hardening=No, REACH SVHC="No SVHC", Ripple Current (AC)=90mA, RoHS Compliant=Yes, Series=FK, Stock 1=332, Supplier 1=Digi-Key, Termination=SMD/SMT, Voltage Rating=25V, Voltage Rating (DC)=25V, Width=5.5mm
C18 C21 C27 C28 C42 C43 C44 C45: library part 865060640001, "CAP ALUM 1UF 20% 50V SMD", Insulation Resistance=16.6667MR, Leakage Current=3uA, Manufacturer="Wurth Electronics", Supplier Part Number=732-8541-1-ND, ComponentLink1Description=http://www.farnell.com/datasheets/1880069.pdf?src-supplier=Farnell, ComponentLink1URL=http://www.farnell.com/datasheets/1880069.pdf?src-supplier=Farnell, ComponentLink2Description=http://www.farnell.com/datasheets/1880069.pdf?src-supplier=Newark, ComponentLink2URL=http://www.farnell.com/datasheets/1880069.pdf?src-supplier=Newark, ComponentLink3Description=https://katalog.we-online.de/pbs/datasheet/865060640001.pdf?src-supplier=Digikey, ComponentLink3URL=https://katalog.we-online.de/pbs/datasheet/865060640001.pdf?src-supplier=Digikey, ComponentLink4Description=http://katalog.we-online.de/pbs/datasheet/865060640001.pdf?src-supplier=Digikey, ComponentLink4URL=http://katalog.we-online.de/pbs/datasheet/865060640001.pdf?src-supplier=Digikey, ComponentLink5Description=http://www.farnell.com/datasheets/1880069.pdf?src-supplier=Element14, ComponentLink5URL=http://www.farnell.com/datasheets/1880069.pdf?src-supplier=Element14, Item Type=Capacitor, Length=5.5mm, Manufacturer Part Number=865060640001, Pricing="1=0.17, 50=0.141, 100=0.123, 250=0.109, 500=0.095, 1000=0.091 (USD)", RoHS=Yes, Stock=18299, Supplier=Digikey
C41: library part CL05A475MO5NUNC, "CAP CER 4.7UF 16V X5R 0402", Case Code (Imperial)=0402, Case Code (Metric)=1005, Manufacturer=Samsung, Max Operating Temperature=85°C, Min Operating Temperature=-55°C, Tolerance=20%, Voltage Rating=16V, Capacitance=4.7uF, Case/Package=0402, Category="Ceramic Capacitors", ComponentLink1Description=http://www.farnell.com/datasheets/2710653.pdf?src-supplier=Farnell, ComponentLink1URL=http://www.farnell.com/datasheets/2710653.pdf?src-supplier=Farnell, ComponentLink2Description=http://www.samsungsem.com/kr/support/product-search/mlcc/CL05A475MO5NUNC.jsp?src-supplier=Digikey, ComponentLink2URL=http://www.samsungsem.com/kr/support/product-search/mlcc/CL05A475MO5NUNC.jsp?src-supplier=Digikey, ComponentLink3Description=http://www.farnell.com/datasheets/2710653.pdf?src-supplier=Element14, ComponentLink3URL=http://www.farnell.com/datasheets/2710653.pdf?src-supplier=Element14, ComponentLink4Description=https://datasheet.octopart.com/CL05A475MO5NUNC-Samsung-Electro-Mechanics-datasheet-123102911.pdf?src-supplier=Future+Electronics, ComponentLink4URL=https://datasheet.octopart.com/CL05A475MO5NUNC-Samsung-Electro-Mechanics-datasheet-123102911.pdf?src-supplier=Future+Electronics, ComponentLink5Description=http://www.farnell.com/datasheets/2710653.pdf?src-supplier=Newark, ComponentLink5URL=http://www.farnell.com/datasheets/2710653.pdf?src-supplier=Newark, Height=550um, Length=0.039inch, Manufacturer Part Number=CL05A475MO5NUNC, Material=4241ConductorMaterial, Mount="Surface Mount", Packaging="Cut Tape", Pricing 1="10000=0.09712 (USD)", RoHS=Yes, RoHS Compliant=Yes, Series=CL, Stock 1=50000, Supplier 1=Avnet, Supplier Part Number 1=CL05A475MO5NUNC, Thickness=0.022inch, Voltage Rating (DC)=16V, Width=0.02inch
D1: "60V 700mV@1A 1A SMA(DO-214AC) Schottky Barrier Diodes (SBD) ROHS", LCSC Part Number=C2481, Manufacturer=MDD, Package=SMA(DO-214AC), ComponentLink1Description=LCSC, ComponentLink1URL=https://www.lcsc.com/product-detail/Schottky-Barrier-Diodes-SBD_MDD-Microdiode-Electronics-SS16_C2481.html, Item Type="Schottky Diode", Manufacturer Part Number=SS16
D2: "TVS DIODE 26VWM 42.1VC SMB", LCSC Part Number=C135062, Manufacturer=Diodes, Supplier Part Number=3363900, ComponentLink1Description=https://datasheet.ciiva.com/15143/getdatasheetpartid-118169-15143570.pdf?src-supplier=Verical, ComponentLink1URL=https://datasheet.ciiva.com/15143/getdatasheetpartid-118169-15143570.pdf?src-supplier=Verical, ComponentLink2Description=https://datasheet.ciiva.com/16211/ds19002-16211003.pdf?src-supplier=Future+Electronics, ComponentLink2URL=https://datasheet.ciiva.com/16211/ds19002-16211003.pdf?src-supplier=Future+Electronics, Item Type="TVS Diodes", Manufacturer Part Number=SMBJ26A-13-F, Pricing="3000=0.0717, 9000=0.069, 15000=0.0677, 30000=0.0661, 60000=0.0635 (USD)", RoHS=Yes, Stock=9000, Supplier="Future Electronics"
F1: library part BSMD1812-150-33V, "33V 1.5A 40A 3A 1812 Resettable Fuses ROHS", LCSC Part Number=C883154, Manufacturer=BHFUSE, Package=1812, ComponentLink1Description=LCSC, ComponentLink1URL=https://www.lcsc.com/product-detail/Resettable-Fuses_BHFUSE-BSMD1812-150-33V_C883154.html, Item Type=Fuse, Manufacturer Part Number=BSMD1812-150-33V
J1: "CONN PWR JACK 2X5.5MM SOLDER", LCSC Part Number=C22359773, Manufacturer="CUI Devices", ComponentLink1Description=https://www.cuidevices.com/product/resource/digikeypdf/pj-051ah.pdf?src-supplier=Digikey, ComponentLink1URL=https://www.cuidevices.com/product/resource/digikeypdf/pj-051ah.pdf?src-supplier=Digikey, ComponentLink2Description=https://datasheet.octopart.com/PJ-051AH-CUI-Devices-datasheet-137760691.pdf?src-supplier=Future+Electronics, ComponentLink2URL=https://datasheet.octopart.com/PJ-051AH-CUI-Devices-datasheet-137760691.pdf?src-supplier=Future+Electronics, ComponentLink3Description=https://datasheet.octopart.com/PJ-051AH-CUI-Devices-datasheet-141000361.pdf?src-supplier=Master+Electronics, ComponentLink3URL=https://datasheet.octopart.com/PJ-051AH-CUI-Devices-datasheet-141000361.pdf?src-supplier=Master+Electronics, Item Type="Power Connectors", Manufacturer Part Number=PJ-051AH, Pricing="1=1.1, 10=0.839, 25=0.754, 50=0.6964, 100=0.6438, 250=0.58156, 500=0.53948, 1000=0.50126, 2500=0.45618 (USD)", RoHS=Yes, Stock=42904, Supplier=Digikey
J2 J3 J5 J6 J9 J12 J14 J16: "CONN HEADER SMD R/A 4POS 2MM", LCSC Part Number=C265102, Manufacturer=JST, Supplier Part Number=7687031, ComponentLink1Description=https://datasheet.ciiva.com/11746/0900766b80df0d9d-11746552.pdf?src-supplier=Rs, ComponentLink1URL=https://datasheet.ciiva.com/11746/0900766b80df0d9d-11746552.pdf?src-supplier=Rs, ComponentLink2Description=https://datasheet.ciiva.com/712/eph-712578.pdf?src-supplier=Digikey, ComponentLink2URL=https://datasheet.ciiva.com/712/eph-712578.pdf?src-supplier=Digikey, ComponentLink3Description=https://datasheet.ciiva.com/712/eph-712579.pdf?src-supplier=Digikey, ComponentLink3URL=https://datasheet.ciiva.com/712/eph-712579.pdf?src-supplier=Digikey, ComponentLink4Description=https://datasheet.ciiva.com/730/eph-730675.pdf?src-supplier=Digikey, ComponentLink4URL=https://datasheet.ciiva.com/730/eph-730675.pdf?src-supplier=Digikey, ComponentLink5Description=https://datasheet.ciiva.com/8052/1699381-8052234.pdf?src-supplier=Element14, ComponentLink5URL=https://datasheet.ciiva.com/8052/1699381-8052234.pdf?src-supplier=Element14, Gender=29Gender, Item Type=Connectors, Manufacturer Part Number=S4B-PH-SM4-TB(LF)(SN), Pricing="1=0.935, 10=0.83, 40=0.77, 150=0.71, 500=0.655 (USD)", RoHS=Yes, Stock=78, Supplier="Future Electronics"
J4 J7: "Gold 250V 3A Straight Square Pins 2.5mm 3P 260℃ 6mm -40℃~+105℃ 3mm 2.54mm Plugin Black Brass 1x3P Plugin,P=2.54mm Pin Headers ROHS", LCSC Part Number=C706875, Manufacturer=XKB, Package=Plugin,P=2.54mm, ComponentLink1Description=LCSC, ComponentLink1URL=https://www.lcsc.com/product-detail/Pin-Headers_XKB-Connectivity-X6511WV-03H-C60D30_C706875.html, Item Type="Male Header", Manufacturer Part Number=X6511WV-03H-C60D30
J8 J17 J20 J22: "RCA PHONO JACK, VERTICAL, BLK RO", Manufacturer=Kycon, Supplier Part Number=2092-KLPX-0848-2-B-ND, ComponentLink1Description=http://www.mouser.com/ds/2/222/KLPX-334830.pdf?src-supplier=Mouser, ComponentLink1URL=http://www.mouser.com/ds/2/222/KLPX-334830.pdf?src-supplier=Mouser, ComponentLink2Description=http://domino2.kycon.com/catalog_PDF/Standard%20Catalog%20page/RCA%20Phono%20Jacks/SKLPX.pdf?src-supplier=Avnet, ComponentLink2URL=http://domino2.kycon.com/catalog_PDF/Standard%20Catalog%20page/RCA%20Phono%20Jacks/SKLPX.pdf?src-supplier=Avnet, ComponentLink3Description=http://www.kycon.com/2013Catalogpage/RCA/KLPX.pdf?src-supplier=Digikey, ComponentLink3URL=http://www.kycon.com/2013Catalogpage/RCA/KLPX.pdf?src-supplier=Digikey, ComponentLink4Description=https://datasheet.octopart.com/KLPX-0848-2-B-Kycon-datasheet-116534117.pdf?src-supplier=Toby+Electronics, ComponentLink4URL=https://datasheet.octopart.com/KLPX-0848-2-B-Kycon-datasheet-116534117.pdf?src-supplier=Toby+Electronics, Item Type=Connectors, Manufacturer Part Number=KLPX-0848-2-B, Pricing="1=0.98, 10=0.826, 25=0.7928, 50=0.7758, 100=0.7421, 250=0.67468, 500=0.60722, 1000=0.53974, 2500=0.48914 (USD)", RoHS=Yes, Stock=3463, Supplier=Digikey
J11: "20℃~+70℃ 3.5mm Headphone Jack 235℃ 30V 500mA Plugin Audio Connectors (Headphones) ROHS", LCSC Part Number=C500090, Manufacturer="XKB Connection", Package=Plugin, ComponentLink1Description=LCSC, ComponentLink1URL=https://www.lcsc.com/product-detail/Audio-Connectors-Headphones_XKB-Connection-PJ-3582-B_C500090.html, Item Type="Audio Connectors", Manufacturer Part Number=PJ-3582-B
J13 J15 J18 J19 J21 J23: "RCA PHONO JACK, VERTICAL, RED RO", Manufacturer=Kycon, Supplier Part Number=2092-KLPX-0848-2-R-ND, ComponentLink1Description=http://www.mouser.com/ds/2/222/KLPX-334830.pdf?src-supplier=Mouser, ComponentLink1URL=http://www.mouser.com/ds/2/222/KLPX-334830.pdf?src-supplier=Mouser, ComponentLink2Description=http://domino2.kycon.com/catalog_PDF/Standard%20Catalog%20page/RCA%20Phono%20Jacks/SKLPX.pdf?src-supplier=Avnet, ComponentLink2URL=http://domino2.kycon.com/catalog_PDF/Standard%20Catalog%20page/RCA%20Phono%20Jacks/SKLPX.pdf?src-supplier=Avnet, ComponentLink3Description=http://www.kycon.com/2013Catalogpage/RCA/KLPX.pdf?src-supplier=Digikey, ComponentLink3URL=http://www.kycon.com/2013Catalogpage/RCA/KLPX.pdf?src-supplier=Digikey, ComponentLink4Description=https://datasheet.octopart.com/KLPX-0848-2-R-Kycon-datasheet-116534117.pdf?src-supplier=Toby+Electronics, ComponentLink4URL=https://datasheet.octopart.com/KLPX-0848-2-R-Kycon-datasheet-116534117.pdf?src-supplier=Toby+Electronics, Item Type=Connectors, Manufacturer Part Number=KLPX-0848-2-R, Pricing="1=1.16, 10=0.885, 25=0.7956, 50=0.7348, 100=0.6795, 250=0.61388, 500=0.5695, 1000=0.52924, 2500=0.48174 (USD)", RoHS=Yes, Stock=613, Supplier=Digikey
J?: "CBL PLUG-OF-NAILS 10-PIN", Manufacturer=Tag-Connect, Package Quantity=1, Supplier Part Number 1=TC2050-IDC-NL-ND, ComponentLink1Description=http://www.tag-connect.com/Materials/TC2050-IDC-NL%20Datasheet.pdf?src-supplier=Digi-Key, ComponentLink1URL=http://www.tag-connect.com/Materials/TC2050-IDC-NL%20Datasheet.pdf?src-supplier=Digi-Key, Manufacturer Part Number=TC2050-IDC-NL, Pricing 1="1=40.17 (USD)", Stock 1=544, Supplier 1=Digi-Key
L1 L4: library part 1286AS-H-R47M=P2, "FIXED IND 470NH 3.4A 52 MOHM SMD", Case Code (Imperial)=0806, Case Code (Metric)=2016, Current Rating=3.4A, DC Resistance (DCR)=52mR, LCSC Part Number=C160957, Manufacturer=Murata, Manufacturer Part Number=1286AS-H-R47M=P2, Max DC Current=3.8A, Max Operating Temperature=85°C, Min Operating Temperature=-40°C, Supplier Part Number=490-10606-1-ND, Test Frequency=1MHz, Tolerance=20%, Case/Package=0806, Category="Fixed Inductors", ComponentLink1Description=http://www.farnell.com/datasheets/2021974.pdf?src-supplier=Farnell, ComponentLink1URL=http://www.farnell.com/datasheets/2021974.pdf?src-supplier=Farnell, ComponentLink2Description=http://www.toko.co.jp/products/pdf/inductors/dfe201612c.pdf?src-supplier=Avnet, ComponentLink2URL=http://www.toko.co.jp/products/pdf/inductors/dfe201612c.pdf?src-supplier=Avnet, ComponentLink3Description=http://search.murata.co.jp/Ceramy/image/img/P02/J(E)TE243A-0010_DFE201612C_reference.pdf?src-supplier=Digi-Key, ComponentLink3URL=http://search.murata.co.jp/Ceramy/image/img/P02/J(E)TE243A-0010_DFE201612C_reference.pdf?src-supplier=Digi-Key, ComponentLink4Description=http://www.toko.co.jp/products/pdf/inductors/dfe201612c.pdf?src-supplier=Digi-Key, ComponentLink4URL=http://www.toko.co.jp/products/pdf/inductors/dfe201612c.pdf?src-supplier=Digi-Key, Core Material=Ferrite, Depth=1.6mm, Height - Seated (Max)=0.047inch, Item Type=Inductor, Length=0.079inch, Mounting Technology="Surface Mount", Packaging="Cut Tape", Pricing="1=0.39, 10=0.348, 25=0.3048, 50=0.2612, 100=0.2394, 250=0.21764, 500=0.2046, 1000=0.15671 (USD)", RoHS=Yes, RoHS Compliant=Yes, Series=DFE201612C, Shielding=Shielded, Stock=12493, Supplier=Digi-Key, Width=0.063inch
L2 L3: library part YPRH0703-4R7M, "2.26A 4.7uH ±20% SMD,7.3x7.3mm Power Inductors ROHS", LCSC Part Number=C338836, Manufacturer=YJYCOIN, Package=SMD,7.3x7.3mm, ComponentLink1Description=LCSC, ComponentLink1URL=https://www.lcsc.com/product-detail/Power-Inductors_YJYCOIN-YPRH0703-4R7M_C338836.html, Item Type=Inductor, Manufacturer Part Number=YPRH0703-4R7M
LED1 LED2 LED3 LED4: "IR Led 3mm Through", ComponentLink1Description=Aliexpress, ComponentLink1URL=https://nl.aliexpress.com/item/32950109432.html?spm=a2g0o.productlist.0.0.2d9749ecxdTGvK&algo_pvid=f3c88197-d0dd-4360-badc-ef5a9d1d435b&algo_exp_id=f3c88197-d0dd-4360-badc-ef5a9d1d435b-1&pdp_ext_f=%7B%22sku_id%22%3A%2266309321327%22%7D
Q1 Q2 Q3 Q4 Q6 Q8 Q10 Q12: "TRANS PREBIAS NPN 50V SOT23-3", Manufacturer="Diodes Zetex", Supplier Part Number=DDTD113ZC-7FDICT-ND, ComponentLink1Description=https://datasheet.ciiva.com/15139/getdatasheetpartid-323116-15139824.pdf?src-supplier=Verical, ComponentLink1URL=https://datasheet.ciiva.com/15139/getdatasheetpartid-323116-15139824.pdf?src-supplier=Verical, Item Type=BJTs, Manufacturer Part Number=DDTD113ZC-7-F, Pricing="1=0.31, 10=0.21, 100=0.1027, 500=0.08562, 1000=0.05949 (USD)", RoHS=Yes, Stock=793860, Supplier=Digikey
R1 R2 R3 R4 R5 R16 R17 R20 R22 R23 R25 R32: library part RC0402FR-074K7L, "RES 4.7K OHM 1% 1/16W 0402", Case Code (Imperial)=0402, Case Code (Metric)=1005, LCSC Part Number=C105871, Manufacturer=Yageo, Max Operating Temperature=155°C, Max Power Dissipation=63mW, Min Operating Temperature=-55°C, Power Rating=62.5mW, Resistance=4.7kR, Resistance Tolerance=1%, Resistor Type="Thick Film", Temperature Coefficient=100ppm/°C, Voltage Rating=50V, Case/Package=0402, Category="Chip SMD Resistors", ComponentLink1Description=https://datasheet.ciiva.com/22661/1686128-22661342.pdf?src-supplier=Element14, ComponentLink1URL=https://datasheet.ciiva.com/22661/1686128-22661342.pdf?src-supplier=Element14, ComponentLink2Description=https://datasheet.ciiva.com/7850/1018594-7850022.pdf?src-supplier=Element14, ComponentLink2URL=https://datasheet.ciiva.com/7850/1018594-7850022.pdf?src-supplier=Element14, ComponentLink3Description=https://datasheet.ciiva.com/7850/1018594-7850023.pdf?src-supplier=Element14, ComponentLink3URL=https://datasheet.ciiva.com/7850/1018594-7850023.pdf?src-supplier=Element14, ComponentLink4Description=https://datasheet.ciiva.com/15215/getdatasheetpartid-328119-15215035.pdf?src-supplier=Verical, ComponentLink4URL=https://datasheet.ciiva.com/15215/getdatasheetpartid-328119-15215035.pdf?src-supplier=Verical, Construction=Rectangular, Depth=0.5mm, Features="Moisture Resistant", Height=0.32mm, Height - Seated (Max)=0.016inch, Item Type=Resistor, Lead Free="Lead Free", Length=1mm, Manufacturer Part Number=RC0402FR-074K7L, Military Standard=Not, Number of Pins=2, Number of Terminations=2, Packaging="Tape and Reel", Pricing 1="10000=0.00085 (USD)", Reach SVHC Compliant=Yes, RoHS=Yes, RoHS Compliant=Yes, Series=RC, Size Code=0402, Stock 1=2420000, Supplier 1=Avnet, Supplier Part Number 1=RC0402FR-074K7L, Termination=SMD/SMT, Tolerance=1%, Voltage Rating (DC)=50V, Width=0.5mm
R6 R10 R13 R18 R21 R27 R36 R39: library part RC0603FR-07100RL, "RES SMD 100 OHM 1% 1/10W 0603", Case Code (Imperial)=0603, Case Code (Metric)=1608, LCSC Part Number=C105588, Manufacturer=Yageo, Max Operating Temperature=155°C, Max Power Dissipation=100mW, Min Operating Temperature=-55°C, Resistance Tolerance=1%, Resistor Type="Thick Film", Temperature Coefficient=100ppm/°C, Voltage Rating=50V, Case/Package=0603, Category="Chip SMD Resistors", Construction=Rectangular, Depth=0.8mm, Features="Moisture Resistant", Height=0.45mm, Item Type=Resistor, Lead Free="Lead Free", Length=1.6mm, Manufacturer Part Number=RC0603FR-07100RL, Military Standard=Not, Number of Pins=2, Number of Terminations=2, Packaging="Tape and Reel", Power Rating=100mW, Pricing 1="5000=0.00300, 5000=0.00200, 5000=0.00450, 50000=0.00410, 500000=0.00230, 2500000=0.00140 (USD)", REACH SVHC=Unknown, Resistance=100R, RoHS=Yes, RoHS Compliant=Yes, Series=RC, Size Code=0603, Stock 1=3800000, Supplier 1="Arrow Electronics", Supplier Part Number 1=RC0603FR-07100RL, Technology="THICK FILM", Termination=SMD/SMT, Tolerance=1%, Voltage Rating (DC)=50V, Width=0.8mm
R7 R9 R12 R15: library part CRCW0402330KFKEDC, "RES 330K OHM 1% 1/16W 0402", Case/Package=0402, LCSC Part Number=C3009051, Manufacturer=Vishay, Power Rating=63mW, Supplier Part Number=71-CRCW0402330KFKEDC, Tolerance=1%, Category="Chip SMD Resistors", Item Type=Resistor, Lead Free="Lead Free", Manufacturer Part Number=CRCW0402330KFKEDC, Pricing="1=0.1, 10=0.017, 50=0.017, 100=0.008, 1000=0.005, 10000=0.004 (USD)", RoHS=Yes, RoHS Compliant=Yes, Stock=34154, Supplier=Mouser